# Altium PCB STM32H743I-EVAL2PCBDESIGN.PcbDoc (part 5 of 23)
Units mil, origin at the board's own origin, x right, y up, seen from the top; angles counter-clockwise.
Board outline 6558 x 5417 mil, 8 copper layers (L1_TOP, L2_GND, L3_HS1, L4_POWER, L5_SIG, L6_HS2, L7_GND, L8_BOTTOM), stack 61.368 mil thick; 620 components, 588 nets, 2945 pads, 1724 vias.
Unrouted connection lines stored in the file: 1.
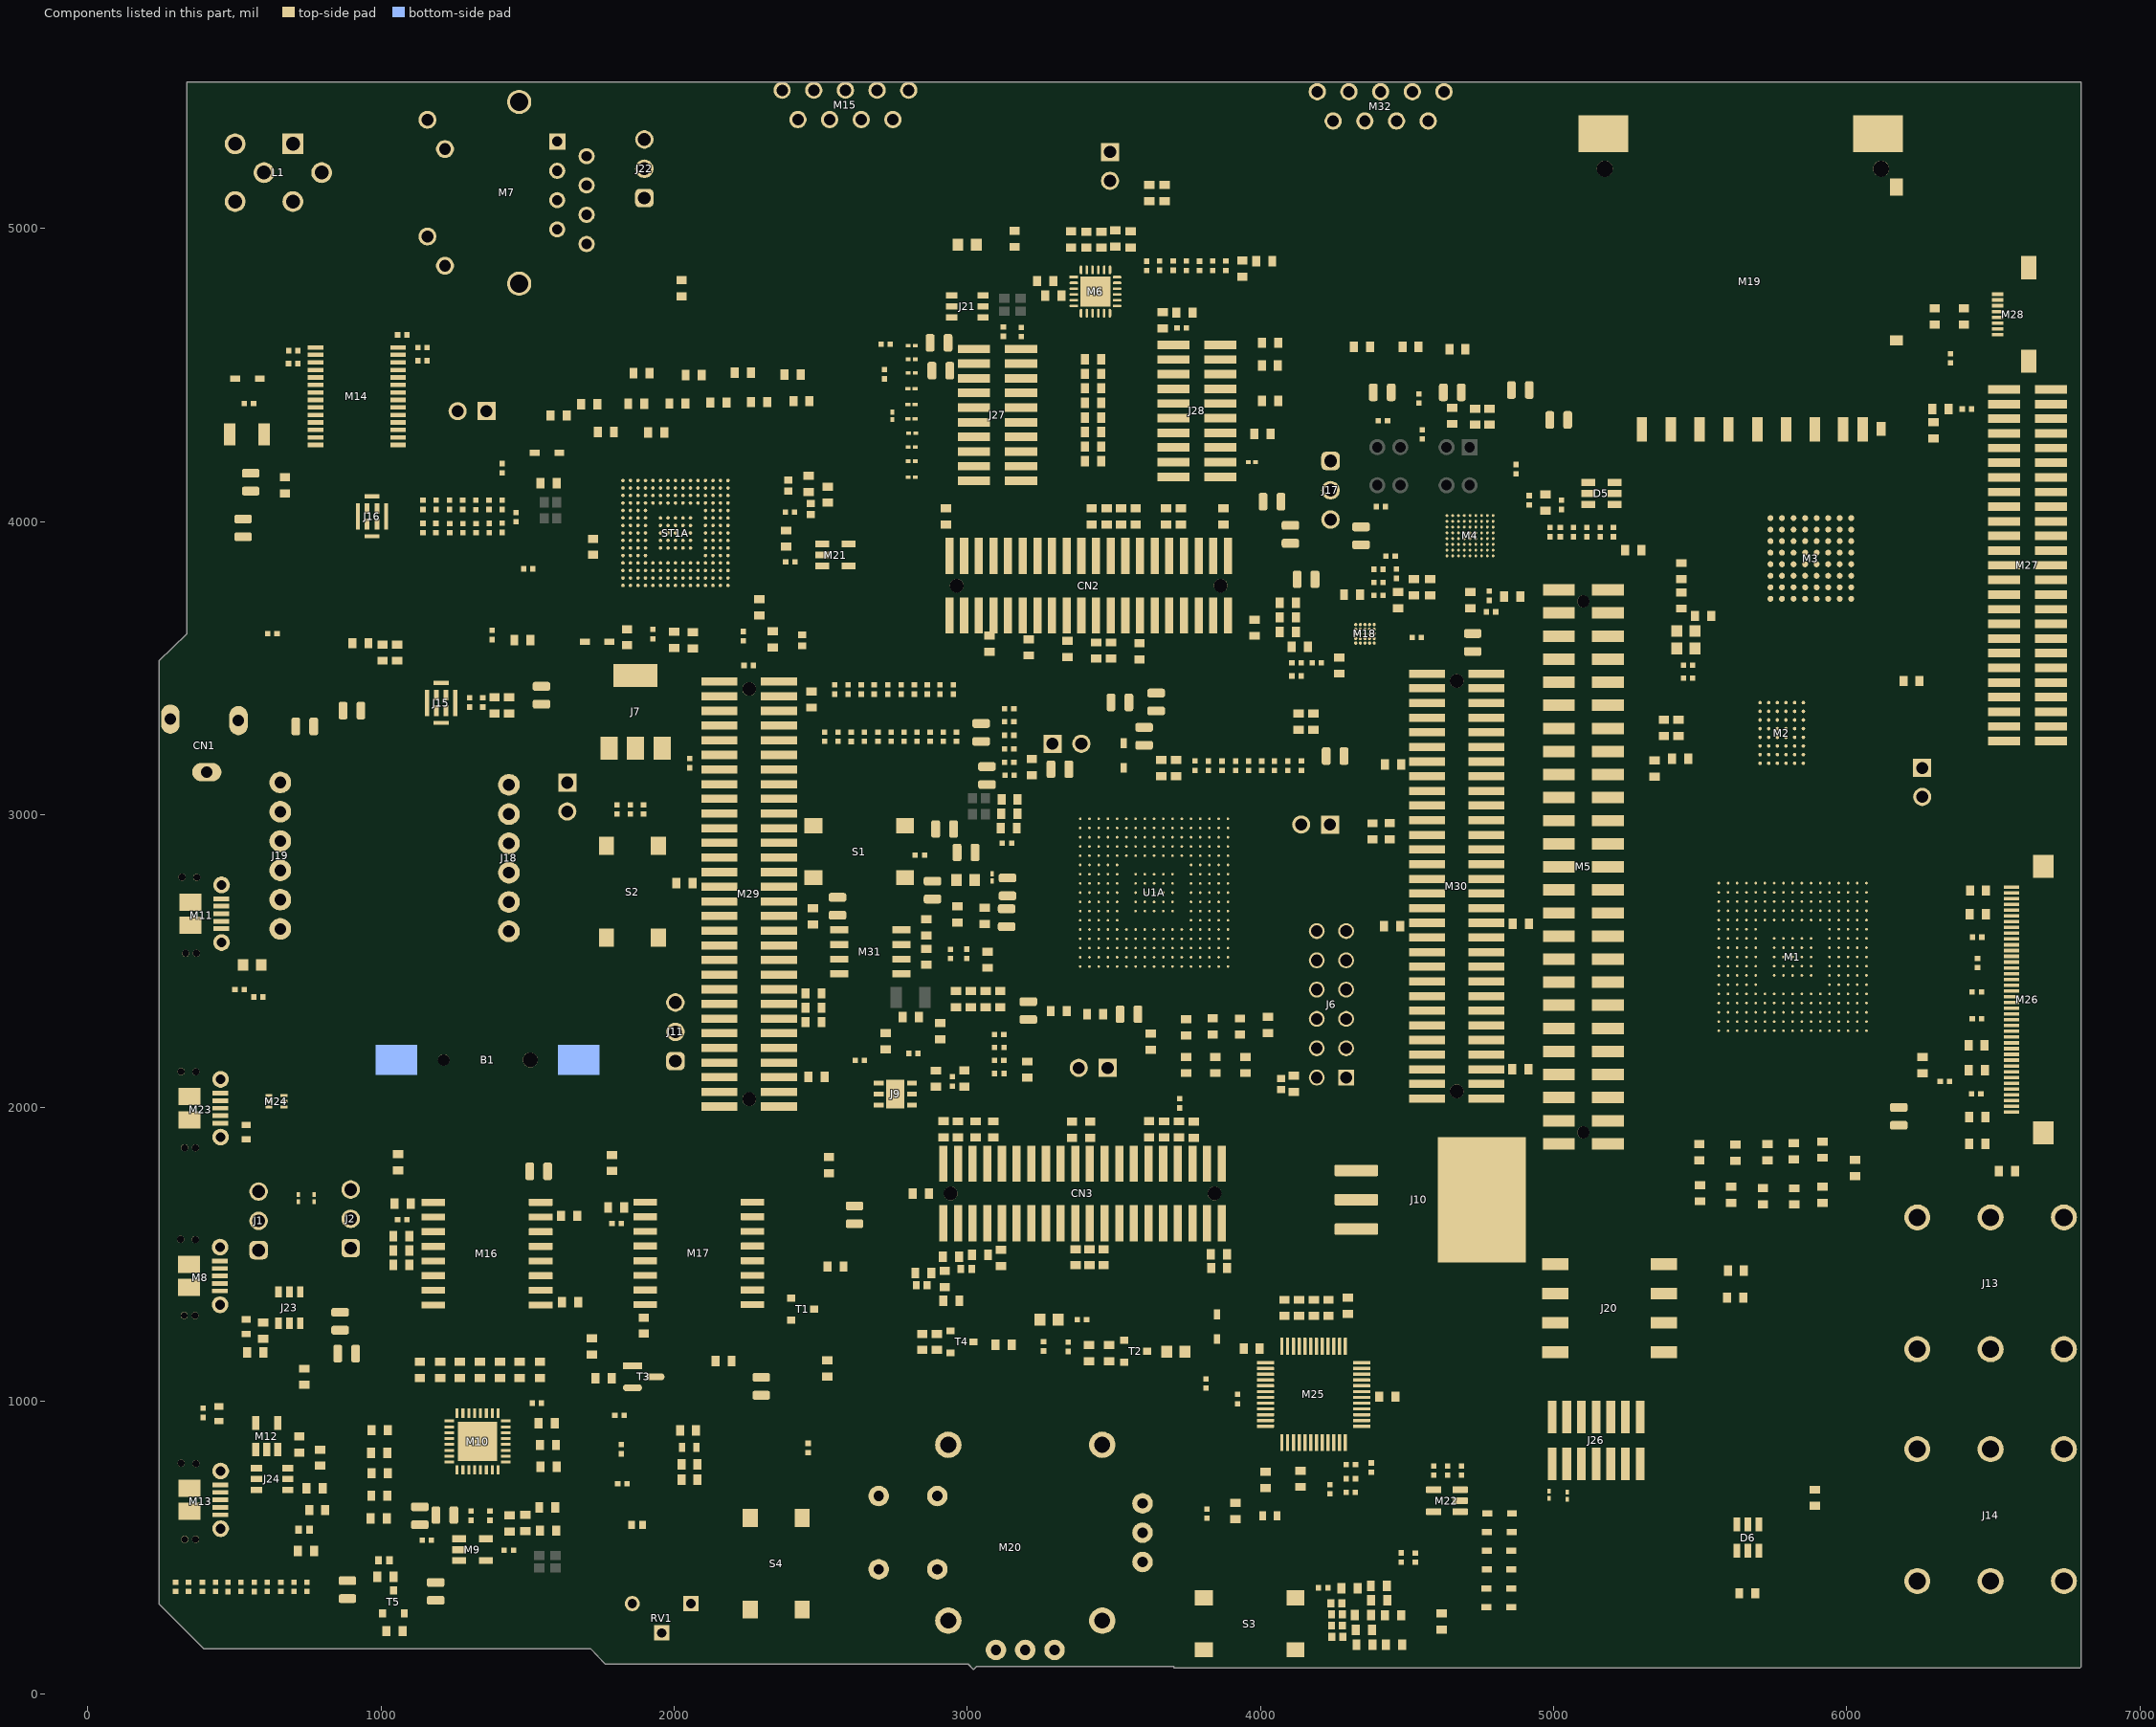
[diagram p8: the components of this part, seen from the top]

## Part data (continued)
J18 J19: "Female, 6C, Rt Angle, .100\"CC; 3.15mm Tail, No Mounting; PBT, Phos. Bronze, 105 C", Color=Black, Current Rating=3A, Dielectric Material=Polyester, Manufacturer=Sullins, Supplier Part Number=S5481-ND, Category="Card Edge Connectors", ComponentLink1Description=https://datasheet.octopart.com:443/PPPC061LGBN-RC-Sullins-datasheet-138810743.pdf?src-supplier=IHS, ComponentLink1URL=https://datasheet.octopart.com:443/PPPC061LGBN-RC-Sullins-datasheet-138810743.pdf?src-supplier=IHS, ComponentLink2Description=https://datasheet.octopart.com:443/PPPC061LGBN-RC-Sullins-datasheet-41308905.pdf?src-supplier=Future+Electronics, ComponentLink2URL=https://datasheet.octopart.com:443/PPPC061LGBN-RC-Sullins-datasheet-41308905.pdf?src-supplier=Future+Electronics, ComponentLink3Description=https://datasheet.octopart.com:443/PPPC061LGBN-RC-Sullins-datasheet-12511165.pdf?src-supplier=Future+Electronics, ComponentLink3URL=https://datasheet.octopart.com:443/PPPC061LGBN-RC-Sullins-datasheet-12511165.pdf?src-supplier=Future+Electronics, ComponentLink4Description=https://datasheet.octopart.com:443/PPPC061LGBN-RC-Sullins-datasheet-11567.pdf?src-supplier=DigiKey, ComponentLink4URL=https://datasheet.octopart.com:443/PPPC061LGBN-RC-Sullins-datasheet-11567.pdf?src-supplier=DigiKey, Connector Type="Header, Socket", Contact Material=Bronze, Contact Plating=Gold, Gender=Female, Height=2.4mm, Housing Color=Black, Housing Material=Plastic, Lead Free="Lead Free", Length=15.7mm, Lifecycle Status=Production, Manufacturer Part Number=PPPC061LGBN-RC, Mounting Technology="Through Hole", Number of Positions=6, Number of Rows=1, Orientation="Right Angle", Packaging=Bulk, Pitch=2.54mm, Pricing="1=0.64, 10=0.54, 100=0.4586, 500=0.40928, 1000=0.38974, 5000=0.3479, 10000=0.3335 (USD)", REACH SVHC=Yes, RoHS=Compliant, Stock=11545, Supplier=DigiKey, Terminal Pitch=2.54mm, Termination=Solder, Width=8.5mm
J20: "PCB Receptacle, Board-to-Board, 2.54 mm, 2 Rows, 8 Contacts, Surface Mount Right Angle", Color=Black, Contact Resistance=10mΩ, Current Rating=4A, Manufacturer=Samtec, Manufacturer Lifecycle Status=PRODUCTION, Max Current Rating=6.9A, Max Operating Temperature=125°C, Max Voltage Rating (AC)=450V, Min Operating Temperature=-55°C, Supplier Part Number=612-SSM-104-L-DH-ND, Category="Board to Board Connectors", ComponentLink1Description=https://datasheet.octopart.com:443/SSM-104-L-DH-Samtec-datasheet-97289092.pdf?src-supplier=Samtec, ComponentLink1URL=https://datasheet.octopart.com:443/SSM-104-L-DH-Samtec-datasheet-97289092.pdf?src-supplier=Samtec, ComponentLink2Description=https://sigma.octopart.com:443/97289093/technical_drawing/Samtec-SSM-104-L-DH.pdf?src-supplier=Samtec, ComponentLink2URL=https://sigma.octopart.com:443/97289093/technical_drawing/Samtec-SSM-104-L-DH.pdf?src-supplier=Samtec, ComponentLink3Description=https://datasheet.octopart.com:443/SSM-104-L-DH-Samtec-datasheet-59161179.pdf?src-supplier=Farnell, ComponentLink3URL=https://datasheet.octopart.com:443/SSM-104-L-DH-Samtec-datasheet-59161179.pdf?src-supplier=Farnell, ComponentLink4Description=https://datasheet.octopart.com:443/SSM-104-L-DH-Samtec-datasheet-5313070.pdf?src-supplier=Farnell, ComponentLink4URL=https://datasheet.octopart.com:443/SSM-104-L-DH-Samtec-datasheet-5313070.pdf?src-supplier=Farnell, ComponentLink5Description=https://datasheet.octopart.com:443/SSM-104-L-DH-Samtec-datasheet-5322758.pdf?src-supplier=Farnell, ComponentLink5URL=https://datasheet.octopart.com:443/SSM-104-L-DH-Samtec-datasheet-5322758.pdf?src-supplier=Farnell, ComponentLink6Description=https://datasheet.octopart.com:443/SSM-104-L-DH-Samtec-datasheet-8448695.pdf?src-supplier=Newark, ComponentLink6URL=https://datasheet.octopart.com:443/SSM-104-L-DH-Samtec-datasheet-8448695.pdf?src-supplier=Newark, ComponentLink7Description=https://datasheet.octopart.com:443/SSM-104-L-DH-Samtec-datasheet-5318838.pdf?src-supplier=Newark, ComponentLink7URL=https://datasheet.octopart.com:443/SSM-104-L-DH-Samtec-datasheet-5318838.pdf?src-supplier=Newark, ComponentLink8Description=https://datasheet.octopart.com:443/SSM-104-L-DH-Samtec-datasheet-24969253.pdf?src-supplier=Newark, ComponentLink8URL=https://datasheet.octopart.com:443/SSM-104-L-DH-Samtec-datasheet-24969253.pdf?src-supplier=Newark, ComponentLink9Description=https://datasheet.octopart.com:443/SSM-104-L-DH-Samtec-datasheet-140825051.pdf?src-supplier=Master+Electronics, ComponentLink9URL=https://datasheet.octopart.com:443/SSM-104-L-DH-Samtec-datasheet-140825051.pdf?src-supplier=Master+Electronics, ComponentLink10Description=https://datasheet.octopart.com:443/SSM-104-L-DH-Samtec-datasheet-118235308.pdf?src-supplier=Master+Electronics, ComponentLink10URL=https://datasheet.octopart.com:443/SSM-104-L-DH-Samtec-datasheet-118235308.pdf?src-supplier=Master+Electronics, ComponentLink11Description=https://datasheet.octopart.com:443/SSM-104-L-DH-Samtec-datasheet-86818376.pdf?src-supplier=Sager+Electronics, ComponentLink11URL=https://datasheet.octopart.com:443/SSM-104-L-DH-Samtec-datasheet-86818376.pdf?src-supplier=Sager+Electronics, ComponentLink12Description=https://datasheet.octopart.com:443/SSM-104-L-DH-Samtec-datasheet-151470497.pdf?src-supplier=Sager+Electronics, ComponentLink12URL=https://datasheet.octopart.com:443/SSM-104-L-DH-Samtec-datasheet-151470497.pdf?src-supplier=Sager+Electronics, ComponentLink13Description=https://datasheet.octopart.com:443/SSM-104-L-DH-Samtec-datasheet-184352574.pdf?src-supplier=JRH+Electronics, ComponentLink13URL=https://datasheet.octopart.com:443/SSM-104-L-DH-Samtec-datasheet-184352574.pdf?src-supplier=JRH+Electronics, ComponentLink14Description=https://datasheet.octopart.com:443/SSM-104-L-DH-Samtec-datasheet-136395483.pdf?src-supplier=Toby+Electronics, ComponentLink14URL=https://datasheet.octopart.com:443/SSM-104-L-DH-Samtec-datasheet-136395483.pdf?src-supplier=Toby+Electronics, Connector Type="Receptacle, Socket", Contact Material=Bronze, Contact Plating=Gold, Depth=11.18mm, Gender=Receptacle, Housing Color=Black, Lead Free="Lead Free", Lead Pitch=2.54mm, Length=10.16mm, Lifecycle Status=Production, Manufacturer Part Number=SSM-104-L-DH, Mounting Technology="Surface Mount", Number of Contacts=8, Number of Positions=8, Number of Rows=2, Orientation="Right Angle", Pitch=2.54mm, Pricing="1=2.91, 50=2.403, 100=1.995, 500=1.694, 1000=1.59375 (USD)", Radiation Hardening=No, REACH SVHC=No, RoHS=Compliant, Row Spacing=2.54mm, Stock=1, Supplier=DigiKey, Termination=Solder, Voltage Rating=450V, Voltage Rating (AC)=450V, Width=8.13mm
J21 J23 J24: "STMicroelectronics USBLC6-4SC6 Diode TVS USBLC6-4SC6 Tape Reel Surge Protection", Breakdown Voltage=8V, Case/Package=SOT-23, Clamping Voltage=17V, Forward Voltage=860mV, Leakage Current=150nA, Manufacturer=STMicroelectronics, Max Breakdown Voltage=10V, Max Junction Temperature (Tj)=125°C, Max Reverse Leakage Current=2µA, Min Breakdown Voltage=6V, Min Operating Temperature=-40°C, Peak Pulse Current=5A, Peak Pulse Power=130W, Power Line Protection=Yes, Reverse Standoff Voltage=5V, Supplier Part Number=497-4492-2-ND, Test Current=1mA, Category="TVS Diodes", China RoHS=Compliant, ComponentLink1Description=https://datasheet.octopart.com:443/USBLC6-4SC6-STMicroelectronics-datasheet-10411966.pdf?src-supplier=Upverter, ComponentLink1URL=https://datasheet.octopart.com:443/USBLC6-4SC6-STMicroelectronics-datasheet-10411966.pdf?src-supplier=Upverter, ComponentLink2Description=https://datasheet.octopart.com:443/USBLC6-4SC6-STMicroelectronics-datasheet-58295097.pdf?src-supplier=Future+Electronics, ComponentLink2URL=https://datasheet.octopart.com:443/USBLC6-4SC6-STMicroelectronics-datasheet-58295097.pdf?src-supplier=Future+Electronics, ComponentLink3Description=https://datasheet.octopart.com:443/USBLC6-4SC6-STMicroelectronics-datasheet-5415472.pdf?src-supplier=Factory+Futures, ComponentLink3URL=https://datasheet.octopart.com:443/USBLC6-4SC6-STMicroelectronics-datasheet-5415472.pdf?src-supplier=Factory+Futures, ComponentLink4Description=https://datasheet.octopart.com:443/USBLC6-4SC6-STMicroelectronics-datasheet-93958.pdf?src-supplier=Nu+Horizons, ComponentLink4URL=https://datasheet.octopart.com:443/USBLC6-4SC6-STMicroelectronics-datasheet-93958.pdf?src-supplier=Nu+Horizons, ComponentLink5Description=https://datasheet.octopart.com:443/USBLC6-4SC6-STMicroelectronics-datasheet-14050649.pdf?src-supplier=iiiC, ComponentLink5URL=https://datasheet.octopart.com:443/USBLC6-4SC6-STMicroelectronics-datasheet-14050649.pdf?src-supplier=iiiC, ComponentLink6Description=https://datasheet.octopart.com:443/USBLC6-4SC6-STMicroelectronics-datasheet-8428582.pdf?src-supplier=Jameco+(USA), ComponentLink6URL=https://datasheet.octopart.com:443/USBLC6-4SC6-STMicroelectronics-datasheet-8428582.pdf?src-supplier=Jameco+(USA), ComponentLink7Description=https://datasheet.octopart.com:443/USBLC6-4SC6-STMicroelectronics-datasheet-46285.pdf?src-supplier=Farnell, ComponentLink7URL=https://datasheet.octopart.com:443/USBLC6-4SC6-STMicroelectronics-datasheet-46285.pdf?src-supplier=Farnell, Contact Plating=Tin, Depth=1.75mm, Direction=Unidirectional, ESD Protection=Yes, Height=1.45mm, Interface="Ethernet, USB", Lead Free="Lead Free", Length=3mm, Lifecycle Status=Production, Manufacturer Part Number=USBLC6-4SC6, Max Operating Temperature=125°C, Mounting Technology="Surface Mount", Number of Bidirectional Channels=4, Number of Channels=4, Number of Elements=1, Number of Terminals=6, Operating Supply Voltage=860mV, Packaging="Cut Tape", Peak Reverse Current=150nA, Pins=6, Polarity=Unidirectional, Pricing="3000=0.13528, 9000=0.11686 (USD)", Radiation Hardening=No, REACH SVHC=Yes, Reverse Breakdown Voltage=6V, RoHS=Compliant, Schedule B="8536300000, 8536300000|8536300000|8536300000|8536300000|8536300000", Stock=34382, Supplier=DigiKey, Termination=SMD/SMT, Voltage Rating (DC)=5V, Weight=4.535924g, Width=1.75mm, Working Voltage=5V
J26: library part FTSH-107-01-L-DV, "Pin Header, Wire-to-Board, 1.27 mm, 2 Rows, 14 Contacts, Surface Mount, FTSH Series", Color=Black, Manufacturer=Samtec, Manufacturer Lifecycle Status=PRODUCTION, Max Operating Temperature=125°C, Min Operating Temperature=-55°C, Supplier Part Number=612-FTSH-107-01-L-DV-ND, Category="Headers and Wire Housings", ComponentLink1Description=https://datasheet.octopart.com:443/FTSH-107-01-L-DV-Samtec-datasheet-140825048.pdf?src-supplier=Master+Electronics, ComponentLink1URL=https://datasheet.octopart.com:443/FTSH-107-01-L-DV-Samtec-datasheet-140825048.pdf?src-supplier=Master+Electronics, ComponentLink2Description=https://sigma.octopart.com:443/140871554/technical_drawing/Samtec-FTSH-107-01-L-DV.pdf?src-supplier=Samtec, ComponentLink2URL=https://sigma.octopart.com:443/140871554/technical_drawing/Samtec-FTSH-107-01-L-DV.pdf?src-supplier=Samtec, ComponentLink3Description=https://sigma.octopart.com:443/97029548/technical_drawing/Samtec-FTSH-107-01-L-DV.pdf?src-supplier=Samtec, ComponentLink3URL=https://sigma.octopart.com:443/97029548/technical_drawing/Samtec-FTSH-107-01-L-DV.pdf?src-supplier=Samtec, ComponentLink4Description=https://datasheet.octopart.com:443/FTSH-107-01-L-DV-Samtec-datasheet-97029545.pdf?src-supplier=Samtec, ComponentLink4URL=https://datasheet.octopart.com:443/FTSH-107-01-L-DV-Samtec-datasheet-97029545.pdf?src-supplier=Samtec, ComponentLink5Description=https://datasheet.octopart.com:443/FTSH-107-01-L-DV-Samtec-datasheet-62087996.pdf?src-supplier=Farnell, ComponentLink5URL=https://datasheet.octopart.com:443/FTSH-107-01-L-DV-Samtec-datasheet-62087996.pdf?src-supplier=Farnell, ComponentLink6Description=https://datasheet.octopart.com:443/FTSH-107-01-L-DV-Samtec-datasheet-8388575.pdf?src-supplier=Farnell, ComponentLink6URL=https://datasheet.octopart.com:443/FTSH-107-01-L-DV-Samtec-datasheet-8388575.pdf?src-supplier=Farnell, ComponentLink7Description=https://datasheet.octopart.com:443/FTSH-107-01-L-DV-Samtec-datasheet-118235238.pdf?src-supplier=Electro+Sonic, ComponentLink7URL=https://datasheet.octopart.com:443/FTSH-107-01-L-DV-Samtec-datasheet-118235238.pdf?src-supplier=Electro+Sonic, ComponentLink8Description=https://datasheet.octopart.com:443/FTSH-107-01-L-DV-Samtec-datasheet-86818370.pdf?src-supplier=Sager+Electronics, ComponentLink8URL=https://datasheet.octopart.com:443/FTSH-107-01-L-DV-Samtec-datasheet-86818370.pdf?src-supplier=Sager+Electronics, ComponentLink9Description=https://datasheet.octopart.com:443/FTSH-107-01-L-DV-Samtec-datasheet-151470459.pdf?src-supplier=Sager+Electronics, ComponentLink9URL=https://datasheet.octopart.com:443/FTSH-107-01-L-DV-Samtec-datasheet-151470459.pdf?src-supplier=Sager+Electronics, ComponentLink10Description=https://datasheet.octopart.com:443/FTSH-107-01-L-DV-Samtec-datasheet-151470458.pdf?src-supplier=Sager+Electronics, ComponentLink10URL=https://datasheet.octopart.com:443/FTSH-107-01-L-DV-Samtec-datasheet-151470458.pdf?src-supplier=Sager+Electronics, ComponentLink11Description=https://datasheet.octopart.com:443/FTSH-107-01-L-DV-Samtec-datasheet-8459893.pdf?src-supplier=Newark, ComponentLink11URL=https://datasheet.octopart.com:443/FTSH-107-01-L-DV-Samtec-datasheet-8459893.pdf?src-supplier=Newark, ComponentLink12Description=https://datasheet.octopart.com:443/FTSH-107-01-L-DV-Samtec-datasheet-5313432.pdf?src-supplier=Newark, ComponentLink12URL=https://datasheet.octopart.com:443/FTSH-107-01-L-DV-Samtec-datasheet-5313432.pdf?src-supplier=Newark, ComponentLink13Description=https://datasheet.octopart.com:443/FTSH-107-01-L-DV-Samtec-datasheet-138830557.pdf?src-supplier=Newark, ComponentLink13URL=https://datasheet.octopart.com:443/FTSH-107-01-L-DV-Samtec-datasheet-138830557.pdf?src-supplier=Newark, ComponentLink14Description=https://datasheet.octopart.com:443/FTSH-107-01-L-DV-Samtec-datasheet-21214417.pdf?src-supplier=Newark, ComponentLink14URL=https://datasheet.octopart.com:443/FTSH-107-01-L-DV-Samtec-datasheet-21214417.pdf?src-supplier=Newark, ComponentLink15Description=https://datasheet.octopart.com:443/FTSH-107-01-L-DV-Samtec-datasheet-180249087.pdf?src-supplier=JRH+Electronics, ComponentLink15URL=https://datasheet.octopart.com:443/FTSH-107-01-L-DV-Samtec-datasheet-180249087.pdf?src-supplier=JRH+Electronics, ComponentLink16Description=https://datasheet.octopart.com:443/FTSH-107-01-L-DV-Samtec-datasheet-176663386.pdf?src-supplier=Toby+Electronics, ComponentLink16URL=https://datasheet.octopart.com:443/FTSH-107-01-L-DV-Samtec-datasheet-176663386.pdf?src-supplier=Toby+Electronics, ComponentLink17Description=https://datasheet.octopart.com:443/FTSH-107-01-L-DV-Samtec-datasheet-133497664.pdf?src-supplier=Toby+Electronics, ComponentLink17URL=https://datasheet.octopart.com:443/FTSH-107-01-L-DV-Samtec-datasheet-133497664.pdf?src-supplier=Toby+Electronics, ComponentLink18Description=https://datasheet.octopart.com:443/FTSH-107-01-L-DV-Samtec-datasheet-116535196.pdf?src-supplier=Toby+Electronics, ComponentLink18URL=https://datasheet.octopart.com:443/FTSH-107-01-L-DV-Samtec-datasheet-116535196.pdf?src-supplier=Toby+Electronics, Connector Type="Male Pin", Contact Material=Bronze, Contact Mating Length=3.048mm, Contact Plating=Gold, Depth=5.84mm, Gender=Male, Housing Color=Black, Lead Free="Lead Free", Lead Pitch=1.27mm, Length=8.89mm, Lifecycle Status=Production, Manufacturer Part Number=FTSH-107-01-L-DV, Mounting Technology="Surface Mount", Number of Contacts=14, Number of Positions=14, Number of Rows=2, Orientation=Straight, Packaging=Bulk, Pitch=1.27mm, Pricing="1=2.6, 10=2.206, 100=1.8745, 500=1.67322, 1000=1.59339, 5000=1.505 (USD)", Radiation Hardening=No, REACH SVHC=No, RoHS=Compliant, Row Spacing=1.27mm, Stock=385, Supplier=DigiKey, Termination=Solder
J27 J28: "CONN HEADER SMD 20POS 1.27MM / Connector Header Surface Mount 20 position 0.050\" (1.27mm)", Color=Black, Current Rating=3.4A, Manufacturer=Samtec, Manufacturer Lifecycle Status=PRODUCTION, Max Current Rating=1.75A, Max Operating Temperature=125°C, Min Operating Temperature=-55°C, Supplier Part Number=612-FTSH-110-01-L-DV-ND, Category="Headers and Wire Housings", ComponentLink1Description=https://datasheet.octopart.com:443/FTSH-110-01-L-DV-Samtec-datasheet-140825048.pdf?src-supplier=Electro+Sonic, ComponentLink1URL=https://datasheet.octopart.com:443/FTSH-110-01-L-DV-Samtec-datasheet-140825048.pdf?src-supplier=Electro+Sonic, ComponentLink2Description=https://datasheet.octopart.com:443/FTSH-110-01-L-DV-Samtec-datasheet-33007714.pdf?src-supplier=Electro+Sonic, ComponentLink2URL=https://datasheet.octopart.com:443/FTSH-110-01-L-DV-Samtec-datasheet-33007714.pdf?src-supplier=Electro+Sonic, ComponentLink3Description=https://datasheet.octopart.com:443/FTSH-110-01-L-DV-Samtec-datasheet-37173854.pdf?src-supplier=Electro+Sonic, ComponentLink3URL=https://datasheet.octopart.com:443/FTSH-110-01-L-DV-Samtec-datasheet-37173854.pdf?src-supplier=Electro+Sonic, ComponentLink4Description=https://datasheet.octopart.com:443/FTSH-110-01-L-DV-Samtec-datasheet-86818370.pdf?src-supplier=Upverter, ComponentLink4URL=https://datasheet.octopart.com:443/FTSH-110-01-L-DV-Samtec-datasheet-86818370.pdf?src-supplier=Upverter, ComponentLink5Description=https://sigma.octopart.com:443/138897706/technical_drawing/Samtec-FTSH-110-01-L-DV.pdf?src-supplier=Upverter, ComponentLink5URL=https://sigma.octopart.com:443/138897706/technical_drawing/Samtec-FTSH-110-01-L-DV.pdf?src-supplier=Upverter, ComponentLink6Description=https://sigma.octopart.com:443/140871554/technical_drawing/Samtec-FTSH-110-01-L-DV.pdf?src-supplier=Samtec, ComponentLink6URL=https://sigma.octopart.com:443/140871554/technical_drawing/Samtec-FTSH-110-01-L-DV.pdf?src-supplier=Samtec, ComponentLink7Description=https://sigma.octopart.com:443/97029548/technical_drawing/Samtec-FTSH-110-01-L-DV.pdf?src-supplier=Samtec, ComponentLink7URL=https://sigma.octopart.com:443/97029548/technical_drawing/Samtec-FTSH-110-01-L-DV.pdf?src-supplier=Samtec, ComponentLink8Description=https://datasheet.octopart.com:443/FTSH-110-01-L-DV-Samtec-datasheet-97029545.pdf?src-supplier=Samtec, ComponentLink8URL=https://datasheet.octopart.com:443/FTSH-110-01-L-DV-Samtec-datasheet-97029545.pdf?src-supplier=Samtec, ComponentLink9Description=https://datasheet.octopart.com:443/FTSH-110-01-L-DV-Samtec-datasheet-62087996.pdf?src-supplier=Newark, ComponentLink9URL=https://datasheet.octopart.com:443/FTSH-110-01-L-DV-Samtec-datasheet-62087996.pdf?src-supplier=Newark, ComponentLink10Description=https://datasheet.octopart.com:443/FTSH-110-01-L-DV-Samtec-datasheet-100454331.pdf?src-supplier=Master+Electronics, ComponentLink10URL=https://datasheet.octopart.com:443/FTSH-110-01-L-DV-Samtec-datasheet-100454331.pdf?src-supplier=Master+Electronics, ComponentLink11Description=https://datasheet.octopart.com:443/FTSH-110-01-L-DV-Samtec-datasheet-8459893.pdf?src-supplier=Farnell, ComponentLink11URL=https://datasheet.octopart.com:443/FTSH-110-01-L-DV-Samtec-datasheet-8459893.pdf?src-supplier=Farnell, ComponentLink12Description=https://datasheet.octopart.com:443/FTSH-110-01-L-DV-Samtec-datasheet-5313432.pdf?src-supplier=Farnell, ComponentLink12URL=https://datasheet.octopart.com:443/FTSH-110-01-L-DV-Samtec-datasheet-5313432.pdf?src-supplier=Farnell, ComponentLink13Description=https://datasheet.octopart.com:443/FTSH-110-01-L-DV-Samtec-datasheet-5307899.pdf?src-supplier=Farnell, ComponentLink13URL=https://datasheet.octopart.com:443/FTSH-110-01-L-DV-Samtec-datasheet-5307899.pdf?src-supplier=Farnell, ComponentLink14Description=https://datasheet.octopart.com:443/FTSH-110-01-L-DV-Samtec-datasheet-5314914.pdf?src-supplier=element14+APAC, ComponentLink14URL=https://datasheet.octopart.com:443/FTSH-110-01-L-DV-Samtec-datasheet-5314914.pdf?src-supplier=element14+APAC, ComponentLink15Description=https://datasheet.octopart.com:443/FTSH-110-01-L-DV-Samtec-datasheet-183475175.pdf?src-supplier=JRH+Electronics, ComponentLink15URL=https://datasheet.octopart.com:443/FTSH-110-01-L-DV-Samtec-datasheet-183475175.pdf?src-supplier=JRH+Electronics, ComponentLink16Description=https://datasheet.octopart.com:443/FTSH-110-01-L-DV-Samtec-datasheet-176663386.pdf?src-supplier=Toby+Electronics, ComponentLink16URL=https://datasheet.octopart.com:443/FTSH-110-01-L-DV-Samtec-datasheet-176663386.pdf?src-supplier=Toby+Electronics, ComponentLink17Description=https://datasheet.octopart.com:443/FTSH-110-01-L-DV-Samtec-datasheet-133497664.pdf?src-supplier=Toby+Electronics, ComponentLink17URL=https://datasheet.octopart.com:443/FTSH-110-01-L-DV-Samtec-datasheet-133497664.pdf?src-supplier=Toby+Electronics, ComponentLink18Description=https://datasheet.octopart.com:443/FTSH-110-01-L-DV-Samtec-datasheet-116535196.pdf?src-supplier=Toby+Electronics, ComponentLink18URL=https://datasheet.octopart.com:443/FTSH-110-01-L-DV-Samtec-datasheet-116535196.pdf?src-supplier=Toby+Electronics, ComponentLink19Description=https://datasheet.octopart.com:443/FTSH-110-01-L-DV-Samtec-datasheet-151470459.pdf?src-supplier=Sager+Electronics, ComponentLink19URL=https://datasheet.octopart.com:443/FTSH-110-01-L-DV-Samtec-datasheet-151470459.pdf?src-supplier=Sager+Electronics, ComponentLink20Description=https://datasheet.octopart.com:443/FTSH-110-01-L-DV-Samtec-datasheet-151470458.pdf?src-supplier=Sager+Electronics, ComponentLink20URL=https://datasheet.octopart.com:443/FTSH-110-01-L-DV-Samtec-datasheet-151470458.pdf?src-supplier=Sager+Electronics, ComponentLink21Description=https://datasheet.octopart.com:443/FTSH-110-01-L-DV-Samtec-datasheet-150877546.pdf?src-supplier=Sager+Electronics, ComponentLink21URL=https://datasheet.octopart.com:443/FTSH-110-01-L-DV-Samtec-datasheet-150877546.pdf?src-supplier=Sager+Electronics, ComponentLink22Description=https://datasheet.octopart.com:443/FTSH-110-01-L-DV-Samtec-datasheet-138897704.pdf?src-supplier=HQonline, ComponentLink22URL=https://datasheet.octopart.com:443/FTSH-110-01-L-DV-Samtec-datasheet-138897704.pdf?src-supplier=HQonline, Connector Type="Male Pin", Contact Material=Gold, Contact Mating Length=3.048mm, Contact Plating=Gold, Depth=3.43mm, Gender=Male, Height=5.97mm, Housing Color=Black, Lead Free="Lead Free", Length=12.7mm, Lifecycle Status=Production, Manufacturer Package Identifier=FTSH-110-01-L-DV, Manufacturer Part Number=FTSH-110-01-L-DV, Mounting Technology="Surface Mount", Number of Contacts=20, Number of Positions=20, Number of Rows=2, Packaging=Bulk, Pins=20, Pitch=1.27mm, Pricing="1=2.25, 10=1.912, 100=1.6252, 500=1.45068, 1000=1.38145, 5000=1.2875 (USD)", Radiation Hardening=No, REACH SVHC=No, RoHS=Compliant, Row Spacing=1.27mm, Stock=4283, Supplier=DigiKey, Termination=Solder
L1: "Power Line Filter, Emi, 10A, 50V, Th;", Current Rating=10A, Frequency=500.5MHz, Insulation Resistance=100MΩ, Manufacturer=Murata, Max Operating Temperature=85°C, Min Operating Temperature=-40°C, Supplier Part Number=490-18606-ND, Voltage Rating=50V, Category="EMI / RFI Filters", ComponentLink1Description=https://datasheet.octopart.com:443/BNX002-11-Murata-datasheet-180807249.pdf?src-supplier=IHS, ComponentLink1URL=https://datasheet.octopart.com:443/BNX002-11-Murata-datasheet-180807249.pdf?src-supplier=IHS, ComponentLink2Description=https://datasheet.octopart.com:443/BNX002-11-Murata-datasheet-138707586.pdf?src-supplier=ODG+(Origin+Data+Global), ComponentLink2URL=https://datasheet.octopart.com:443/BNX002-11-Murata-datasheet-138707586.pdf?src-supplier=ODG+(Origin+Data+Global), ComponentLink3Description=https://datasheet.octopart.com:443/BNX002-11-Murata-datasheet-140880448.pdf?src-supplier=TME, ComponentLink3URL=https://datasheet.octopart.com:443/BNX002-11-Murata-datasheet-140880448.pdf?src-supplier=TME, ComponentLink4Description=https://datasheet.octopart.com:443/BNX002-11-Murata-datasheet-166534775.pdf?src-supplier=Arrow.cn, ComponentLink4URL=https://datasheet.octopart.com:443/BNX002-11-Murata-datasheet-166534775.pdf?src-supplier=Arrow.cn, ComponentLink5Description=https://datasheet.octopart.com:443/BNX002-11-Murata-datasheet-151955978.pdf?src-supplier=SOS+electronic, ComponentLink5URL=https://datasheet.octopart.com:443/BNX002-11-Murata-datasheet-151955978.pdf?src-supplier=SOS+electronic, ComponentLink6Description=https://datasheet.octopart.com/BNX002-11-Murata-datasheet-129162059.pdf, ComponentLink6URL=https://datasheet.octopart.com/BNX002-11-Murata-datasheet-129162059.pdf, ComponentLink7Description=http://sigma.octopart.com:80/reach_statement/Murata-company-16.pdf?src-supplier=Compliance+Statements, ComponentLink7URL=http://sigma.octopart.com:80/reach_statement/Murata-company-16.pdf?src-supplier=Compliance+Statements, Export Control Classification Number (ECCN) Code=EAR99, Harmonized Tariff Schedule (HTS) Code=8504.50.80.00, Height=12.5mm, Impedance=50Ω, Introduction Date=2019-01-02, Length=12mm, Lifecycle Status=Production, Manufacturer Part Number=BNX002-11, Number of Circuits=1, Packaging=Box, Pricing="1=7.96, 10=6.49, 25=5.9856, 50=5.6306, 100=5.2966, 300=4.80703, 500=4.59488, 1000=4.32164 (USD)", REACH SVHC=Yes, RoHS=Compliant, Stock=13871, Supplier=DigiKey, Voltage Rating (DC)=50V, Width=11mm
L2 L3 L4 L5 L6 L7 L8: "Ferrite Beads Power Chip 18Ohm 30% 100MHz 7.5A 0.004Ohm DCR 0603 Automotive T/R", Case Code (Imperial)=0603, Case Code (Metric)=1608, Clock Frequency=100MHz, Current Rating=7.5A, DC Resistance (DCR)=4mΩ, Manufacturer="TAIYO YUDEN", Max Operating Temperature=125°C, Min Operating Temperature=-40°C, Supplier Part Number=587-3251-6-ND, Tolerance=30%, Case/Package=0603, Category="Ferrite Beads and Chips", ComponentLink1Description=https://datasheet.octopart.com:443/FBMJ1608HM180NTR-Taiyo-Yuden-datasheet-151884371.pdf?src-supplier=IHS, ComponentLink1URL=https://datasheet.octopart.com:443/FBMJ1608HM180NTR-Taiyo-Yuden-datasheet-151884371.pdf?src-supplier=IHS, ComponentLink2Description=https://datasheet.octopart.com:443/FBMJ1608HM180NTR-Taiyo-Yuden-datasheet-154808389.pdf?src-supplier=Master+Electronics, ComponentLink2URL=https://datasheet.octopart.com:443/FBMJ1608HM180NTR-Taiyo-Yuden-datasheet-154808389.pdf?src-supplier=Master+Electronics, ComponentLink3Description=https://datasheet.octopart.com:443/FBMJ1608HM180NTR-Taiyo-Yuden-datasheet-112254974.pdf?src-supplier=Newark, ComponentLink3URL=https://datasheet.octopart.com:443/FBMJ1608HM180NTR-Taiyo-Yuden-datasheet-112254974.pdf?src-supplier=Newark, ComponentLink4Description=https://datasheet.octopart.com:443/FBMJ1608HM180NTR-Taiyo-Yuden-datasheet-99833420.pdf?src-supplier=Future+Electronics, ComponentLink4URL=https://datasheet.octopart.com:443/FBMJ1608HM180NTR-Taiyo-Yuden-datasheet-99833420.pdf?src-supplier=Future+Electronics, ComponentLink5Description=https://datasheet.octopart.com/FBMJ1608HM180NTR-Taiyo-Yuden-datasheet-17272611.pdf, ComponentLink5URL=https://datasheet.octopart.com/FBMJ1608HM180NTR-Taiyo-Yuden-datasheet-17272611.pdf, Halogen Free="Halogen Free", Height=800µm, Impedance=18Ω, Length=1.6mm, Lifecycle Status=Production, Manufacturer Part Number=FBMJ1608HM180NTR, Max Current Rating=7.5A, Max DC Current=7.5A, Max Length=1.8mm, Max Thickness=1mm, Max Width=1mm, Min Length=1.4mm, Min Thickness=600µm, Min Width=600µm, Mounting Technology="Surface Mount", Number of Circuits=1, Number of Lines=1, Number of Terminals=2, Packaging="Cut Tape (CT)", Pricing="1=0.12, 10=0.085, 25=0.0744, 50=0.0666, 100=0.0596, 250=0.05132, 500=0.04556, 1000=0.04024 (USD)", REACH SVHC=Yes, RoHS=Compliant, Stock=36635, Supplier=DigiKey, Termination=SMD/SMT, Test Frequency=100MHz, Weight=2.012816mg, Width=800µm
LD1 LD2 LD3 LD4 LD5 LD6 LD7 LD8 LD9: library part led_green, "LED"
M1: "IC DRAM 256MBIT PAR 90TFBGA"
M2: "16Mb （1M x 16） 1 M x 16 2.4V 95mA 3.6V Parallel 16bit BGA-48 SMD mount 11mm*9mm*1.2mm", Case/Package=TFBGA, Manufacturer=ISSI, Max Operating Temperature=85°C, Max Supply Current=95mA, Max Supply Voltage=3.6V, Min Operating Temperature=-40°C, Min Supply Voltage=2.4V, Nominal Supply Voltage (DC)=3V, Operating Supply Voltage=3.3V, Supplier Part Number=706-1054-ND, Temperature Grade=Industrial, Access Time=10ns, Address Bus Width=20b, Category=RAM, China RoHS=Compliant, ComponentLink1Description=https://datasheet.octopart.com:443/IS61WV102416BLL-10MLI-ISSI-datasheet-134530440.pdf?src-supplier=IHS, ComponentLink1URL=https://datasheet.octopart.com:443/IS61WV102416BLL-10MLI-ISSI-datasheet-134530440.pdf?src-supplier=IHS, ComponentLink2Description=https://datasheet.octopart.com:443/IS61WV102416BLL-10MLI-ISSI-datasheet-11874037.pdf?src-supplier=element14+APAC, ComponentLink2URL=https://datasheet.octopart.com:443/IS61WV102416BLL-10MLI-ISSI-datasheet-11874037.pdf?src-supplier=element14+APAC, ComponentLink3Description=https://datasheet.octopart.com:443/IS61WV102416BLL-10MLI-ISSI-datasheet-140480371.pdf?src-supplier=Augswan, ComponentLink3URL=https://datasheet.octopart.com:443/IS61WV102416BLL-10MLI-ISSI-datasheet-140480371.pdf?src-supplier=Augswan, ComponentLink4Description=https://datasheet.octopart.com:443/IS61WV102416BLL-10MLI-ISSI-datasheet-14189571.pdf?src-supplier=iiiC, ComponentLink4URL=https://datasheet.octopart.com:443/IS61WV102416BLL-10MLI-ISSI-datasheet-14189571.pdf?src-supplier=iiiC, ComponentLink5Description=https://datasheet.octopart.com:443/IS61WV102416BLL-10MLI-ISSI-datasheet-26506.pdf?src-supplier=Mouser, ComponentLink5URL=https://datasheet.octopart.com:443/IS61WV102416BLL-10MLI-ISSI-datasheet-26506.pdf?src-supplier=Mouser, Country of Origin="Mainland China, Taiwan", Density=16Mb, Export Control Classification Number (ECCN) Code=3A991.b.2.a, Harmonized Tariff Schedule (HTS) Code=8542.32.00.41, Height - Seated (Max)=1.2mm, Introduction Date=2006-04-01, Length=11mm, Lifecycle Status=Production, Manufacturer Part Number=IS61WV102416BLL-10MLI, Memory Format="RAM, SRAM - Asynchronous", Memory Size=2MB, Nominal Supply Current=95mA, Number of Circuits=1, Number of Ports=1, Number of Terminals=48, Pins=48, Pricing="1=30.23, 10=27.984, 25=27.0944, 50=26.427, 210=25.07214 (USD)", Radiation Hardening=No, REACH SVHC=Yes, RoHS=Compliant, Schedule B="8542320040, 8542320040|8542320040|8542320040|8542320040|8542320040", Stock=2937, Supplier=DigiKey, Sync/Async=Asynchronous, Terminal Pitch=750µm, Width=9mm, Word Size=16b
M3: "NOR Flash Parallel 3V/3.3V 128M-bit 16M x 8/8M x 16 75ns 64-Pin LBGA Tray", Manufacturer=Micron, Max Operating Temperature=85°C, Max Supply Current=50mA, Max Supply Voltage=3.6V, Min Operating Temperature=-40°C, Min Supply Voltage=2.7V, Nominal Supply Voltage (DC)=3V, Supplier Part Number=557-MT28EW128ABA1LPC-0SITTRCT-ND, Temperature Grade=Industrial, Access Time=70ns, Category=Flash, China RoHS=Compliant, ComponentLink1Description=https://datasheet.octopart.com:443/MT28EW128ABA1LPC-0SIT-TR-Micron-datasheet-149529402.pdf?src-supplier=IHS, ComponentLink1URL=https://datasheet.octopart.com:443/MT28EW128ABA1LPC-0SIT-TR-Micron-datasheet-149529402.pdf?src-supplier=IHS, Height - Seated (Max)=1.4mm, Length=13mm, Lifecycle Status=Production, Manufacturer Part Number="MT28EW128ABA1LPC-0SIT TR", Memory Format=FLASH, Number of Circuits=1, Number of Terminals=64, Pricing="1=49.57, 10=45.82, 25=44.3416, 50=43.2366, 100=42.1478 (USD)", REACH SVHC=Yes, RoHS=Compliant, Schedule B="8542320050|8542320050|8542320050|8542320050|8542320050, 8542320070", Stock=1600, Supplier=DigiKey, Terminal Pitch=1mm, Width=11mm
M4: "Tape & Reel (TR) Active 95 / 100 Stereo Audio codec 94dB 950mV 576mum 96ksps", Ambient Temperature Range High=85°C, Manufacturer="Cirrus Logic", Max Junction Temperature (Tj)=125°C, Max Supply Voltage=3.6V, Min Operating Temperature=-40°C, Min Supply Voltage=950mV, Nominal Supply Voltage (DC)=1V, Supplier Part Number=WM8994ECS/RDKR-ND, Temperature Grade=Industrial, Bandwidth=96kHz, Category=CODECs, ComponentLink1Description=https://datasheet.octopart.com:443/WM8994ECS-R-Cirrus-Logic-datasheet-180105754.pdf?src-supplier=IHS, ComponentLink1URL=https://datasheet.octopart.com:443/WM8994ECS-R-Cirrus-Logic-datasheet-180105754.pdf?src-supplier=IHS, ComponentLink2Description=https://datasheet.octopart.com:443/WM8994ECS-R-Cirrus-Logic-datasheet-12524610.pdf?src-supplier=Augswan, ComponentLink2URL=https://datasheet.octopart.com:443/WM8994ECS-R-Cirrus-Logic-datasheet-12524610.pdf?src-supplier=Augswan, ComponentLink3Description=https://datasheet.octopart.com:443/WM8994ECS-R-Cirrus-Logic-datasheet-134530321.pdf?src-supplier=HQonline, ComponentLink3URL=https://datasheet.octopart.com:443/WM8994ECS-R-Cirrus-Logic-datasheet-134530321.pdf?src-supplier=HQonline, Harmonized Tariff Schedule (HTS) Code=8542.39.00.01, Height=576µm, Height - Seated (Max)=785µm, Interface="2-Wire, I2C, I2S, SPI", Introduction Date=2010-03-11, Lead Free="Lead Free", Length=4.511mm, Lifecycle Status=Production, Manufacturer Part Number=WM8994ECS/R, Max Operating Temperature=85°C, Mounting Technology="Surface Mount", Number of A/D Converters=2, Number of Analog Inputs=8, Number of Analog Outputs=9, Number of Channels=4, Number of Circuits=1, Number of D/A Converters=4, Number of Terminals=72, Operating Supply Voltage=3.6V, Pins=72, Pricing="1=13.95, 10=10.997, 25=10.2576, 100=9.4455, 250=9.4248 (USD)", REACH SVHC=Yes, Resolution=3B, RoHS=Compliant, Sampling Rate=96ksps, Signal to Noise Ratio (SNR)=94dB, Stock=5308, Supplier=DigiKey, Terminal Pitch=500µm, Width=4.023mm
M5: "Conn Shrouded Header HDR 50 POS 2mm Solder ST Top Entry SMD Milli-Grid™ Tube", Color=Black, Contact Resistance=30mΩ, Current Rating=2A, Flammability Rating="UL94 V-0", Insulation Resistance=5GΩ, Manufacturer=Molex, Manufacturer Lifecycle Status=ACTIVE, Max Operating Temperature=105°C, Min Operating Temperature=-55°C, Operating Force=2.0016N, Supplier Part Number=23-0878325020-ND, Voltage Rating=125V, Category="Headers and Wire Housings", China RoHS=Compliant, ComponentLink1Description=https://datasheet.octopart.com:443/87832-5020-Molex-datasheet-136949551.pdf?src-supplier=Farnell, ComponentLink1URL=https://datasheet.octopart.com:443/87832-5020-Molex-datasheet-136949551.pdf?src-supplier=Farnell, ComponentLink2Description=https://datasheet.octopart.com:443/878325020-Molex-datasheet-5313840.pdf?src-supplier=Factory+Futures, ComponentLink2URL=https://datasheet.octopart.com:443/878325020-Molex-datasheet-5313840.pdf?src-supplier=Factory+Futures, ComponentLink3Description=https://sigma.octopart.com:443/10980148/technical_drawing/Molex-87832-5020.pdf?src-supplier=Molex, ComponentLink3URL=https://sigma.octopart.com:443/10980148/technical_drawing/Molex-87832-5020.pdf?src-supplier=Molex, ComponentLink4Description=https://datasheet.octopart.com:443/87832-5020-Molex-datasheet-16471356.pdf?src-supplier=Molex, ComponentLink4URL=https://datasheet.octopart.com:443/87832-5020-Molex-datasheet-16471356.pdf?src-supplier=Molex, ComponentLink5Description=https://datasheet.octopart.com:443/87832-5020-Molex-datasheet-193135970.pdf?src-supplier=JRH+Electronics, ComponentLink5URL=https://datasheet.octopart.com:443/87832-5020-Molex-datasheet-193135970.pdf?src-supplier=JRH+Electronics, ComponentLink6Description=https://datasheet.octopart.com:443/87832-5020-Molex-datasheet-154760575.pdf?src-supplier=Master+Electronics, ComponentLink6URL=https://datasheet.octopart.com:443/87832-5020-Molex-datasheet-154760575.pdf?src-supplier=Master+Electronics, ComponentLink7Description=https://datasheet.octopart.com:443/87832-5020-Molex-datasheet-120074161.pdf?src-supplier=Newark, ComponentLink7URL=https://datasheet.octopart.com:443/87832-5020-Molex-datasheet-120074161.pdf?src-supplier=Newark, ComponentLink8Description=https://datasheet.octopart.com:443/87832-5020-Molex-datasheet-62067460.pdf?src-supplier=element14+APAC, ComponentLink8URL=https://datasheet.octopart.com:443/87832-5020-Molex-datasheet-62067460.pdf?src-supplier=element14+APAC, ComponentLink9Description=https://datasheet.octopart.com:443/87832-5020-Molex-datasheet-58786524.pdf?src-supplier=element14+APAC, ComponentLink9URL=https://datasheet.octopart.com:443/87832-5020-Molex-datasheet-58786524.pdf?src-supplier=element14+APAC, ComponentLink10Description=https://datasheet.octopart.com:443/87832-5020-Molex-datasheet-48881773.pdf?src-supplier=element14+APAC, ComponentLink10URL=https://datasheet.octopart.com:443/87832-5020-Molex-datasheet-48881773.pdf?src-supplier=element14+APAC, ComponentLink11Description=https://datasheet.octopart.com:443/87832-5020-Molex-datasheet-62281904.pdf?src-supplier=Electro+Sonic, ComponentLink11URL=https://datasheet.octopart.com:443/87832-5020-Molex-datasheet-62281904.pdf?src-supplier=Electro+Sonic, ComponentLink12Description=https://datasheet.octopart.com:443/87832-5020-Molex-datasheet-37172766.pdf?src-supplier=Electro+Sonic, ComponentLink12URL=https://datasheet.octopart.com:443/87832-5020-Molex-datasheet-37172766.pdf?src-supplier=Electro+Sonic, ComponentLink13Description=https://datasheet.octopart.com:443/87832-5020-Molex-datasheet-23711305.pdf?src-supplier=Electro+Sonic, ComponentLink13URL=https://datasheet.octopart.com:443/87832-5020-Molex-datasheet-23711305.pdf?src-supplier=Electro+Sonic, ComponentLink14Description=https://datasheet.octopart.com:443/878325020-Molex-datasheet-7554152.pdf?src-supplier=Jameco+(USA), ComponentLink14URL=https://datasheet.octopart.com:443/878325020-Molex-datasheet-7554152.pdf?src-supplier=Jameco+(USA), ComponentLink15Description=https://datasheet.octopart.com:443/87832-5020-Molex-datasheet-8215764.pdf?src-supplier=Jameco+(USA), ComponentLink15URL=https://datasheet.octopart.com:443/87832-5020-Molex-datasheet-8215764.pdf?src-supplier=Jameco+(USA), ComponentLink16Description=https://datasheet.octopart.com:443/87832-5020-Molex-datasheet-166191.pdf?src-supplier=Mouser, ComponentLink16URL=https://datasheet.octopart.com:443/87832-5020-Molex-datasheet-166191.pdf?src-supplier=Mouser, ComponentLink17Description=https://datasheet.octopart.com:443/87832-5020-Molex-datasheet-120596.pdf?src-supplier=DigiKey, ComponentLink17URL=https://datasheet.octopart.com:443/87832-5020-Molex-datasheet-120596.pdf?src-supplier=DigiKey, ComponentLink18Description=http://sigma.octopart.com:80/16471357/rohs_statement/Molex-87832-5020.pdf?src-supplier=Compliance+Statements, ComponentLink18URL=http://sigma.octopart.com:80/16471357/rohs_statement/Molex-87832-5020.pdf?src-supplier=Compliance+Statements, ComponentLink19Description=http://sigma.octopart.com:80/reach_statement/Molex-company-74.pdf?src-supplier=Compliance+Statements, ComponentLink19URL=http://sigma.octopart.com:80/reach_statement/Molex-company-74.pdf?src-supplier=Compliance+Statements, ComponentLink20Description=http://sigma.octopart.com:80/rohs_statement/Molex-company-73.pdf?src-supplier=Compliance+Statements, ComponentLink20URL=http://sigma.octopart.com:80/rohs_statement/Molex-company-73.pdf?src-supplier=Compliance+Statements, ComponentLink21Description=http://sigma.octopart.com:80/conflict_mineral_statement/Molex-company-72.pdf?src-supplier=Compliance+Statements, ComponentLink21URL=http://sigma.octopart.com:80/conflict_mineral_statement/Molex-company-72.pdf?src-supplier=Compliance+Statements, Connector Type="Male Pin", Contact Material=Brass, Contact Mating Length=3.5814mm, Contact Plating=Gold, Country of Origin=SG, Export Control Classification Number (ECCN) Code=EAR99, Gender=Male, Glow Wire Compliant=Non-compliant, Harmonized Tariff Schedule (HTS) Code=8536.69.40.40, Housing Color=Black, Housing Material=Thermoplastic, Insulation Color=Black, Introduction Date=2005-08-24, Lead Free="Contains Lead", Lead Pitch=2mm, Lifecycle Status=Production, Manufacturer Part Number=87832-5020, Mounting Technology="Surface Mount", Number of Circuits=50, Number of Contacts=50, Number of Positions=50, Number of Rows=2, Orientation=Vertical, Pins=50, Pitch=2.0066mm, Plating=Tin, Plating Thickness=381nm, Pricing="1=6.88, 10=5.847, 100=4.9695, 500=4.43622, 1000=4.22468 (USD)", Radiation Hardening=No, REACH SVHC=Yes, RoHS=Compliant, Row Spacing=4.2418mm, Shrouded="Yes RoHS Compliant: Yes", Stock=1664, Supplier=DigiKey, Terminal Pitch=2mm, Termination=Solder, Voltage Rating (DC)=125V
M6: "LAN8742A Series 3.3 V Small Footprint RMII 10/100 Ethernet Transceiver - VQFN-24", Ambient Temperature Range High=70°C, Case/Package=QFN, Manufacturer=Microchip, Manufacturer Lifecycle Status=REL, Max Supply Voltage=3.6V, Min Operating Temperature=0°C, Min Supply Voltage=1.14V, Supplier Part Number=LAN8742A-CZ-DKR-ND, Category="Ethernet Interface ICs", ComponentLink1Description=https://datasheet.octopart.com:443/LAN8742A-CZ-TR-Microchip-datasheet-79167677.pdf?src-supplier=Microchip, ComponentLink1URL=https://datasheet.octopart.com:443/LAN8742A-CZ-TR-Microchip-datasheet-79167677.pdf?src-supplier=Microchip, ComponentLink2Description=https://datasheet.octopart.com:443/LAN8742A-CZ-TR-Microchip-datasheet-21087199.pdf?src-supplier=SHENGYU+ELECTRONICS, ComponentLink2URL=https://datasheet.octopart.com:443/LAN8742A-CZ-TR-Microchip-datasheet-21087199.pdf?src-supplier=SHENGYU+ELECTRONICS, ComponentLink3Description=http://sigma.octopart.com:80/188454385/materials_sheet/Microchip-LAN8742A-CZ-TR.pdf?src-supplier=Compliance+Statements, ComponentLink3URL=http://sigma.octopart.com:80/188454385/materials_sheet/Microchip-LAN8742A-CZ-TR.pdf?src-supplier=Compliance+Statements, ComponentLink4Description=http://sigma.octopart.com:80/192423903/materials_sheet/Microchip-LAN8742A-CZ-TR.pdf?src-supplier=Compliance+Statements, ComponentLink4URL=http://sigma.octopart.com:80/192423903/materials_sheet/Microchip-LAN8742A-CZ-TR.pdf?src-supplier=Compliance+Statements, ComponentLink5Description=http://sigma.octopart.com:80/rohs_statement/Microchip-company-71.pdf?src-supplier=Compliance+Statements, ComponentLink5URL=http://sigma.octopart.com:80/rohs_statement/Microchip-company-71.pdf?src-supplier=Compliance+Statements, ComponentLink6Description=http://sigma.octopart.com:80/reach_statement/Microchip-company-70.pdf?src-supplier=Compliance+Statements, ComponentLink6URL=http://sigma.octopart.com:80/reach_statement/Microchip-company-70.pdf?src-supplier=Compliance+Statements, ComponentLink7Description=http://sigma.octopart.com:80/conflict_mineral_statement/Microchip-company-69.pdf?src-supplier=Compliance+Statements, ComponentLink7URL=http://sigma.octopart.com:80/conflict_mineral_statement/Microchip-company-69.pdf?src-supplier=Compliance+Statements, ComponentLink8Description=http://sigma.octopart.com:80/conflict_mineral_statement/Microchip-company-68.pdf?src-supplier=Compliance+Statements, ComponentLink8URL=http://sigma.octopart.com:80/conflict_mineral_statement/Microchip-company-68.pdf?src-supplier=Compliance+Statements, Country of Assembly=Taiwan, Country of Fabrication=Singapore, Country of Origin=Taiwan, Data Rate=100Mbps, Export Control Classification Number (ECCN) Code=EAR99, Harmonized Tariff Schedule (HTS) Code=8542.39.0060, Height=1mm, HS Code=8542.39.0090, Interface=Ethernet, Lifecycle Status=Production, Manufacturer Part Number=LAN8742A-CZ-TR, Max Operating Temperature=70°C, Mounting Technology="Surface Mount", Number of Channels=1, Number of Transceivers=1, Pins=24, Pricing="1=1.53, 25=1.3312 (USD)", Projected EOL Date=2039-04-22, Radiation Hardening=No, RoHS=Compliant, Schedule B="8542390000, 8542390000|8542390000|8542390000|8542390000|8542390000", Stock=18382, Supplier=DigiKey
M7: "Modular Connectors / Ethernet; PULSE; J0011D21BNL; Through Hole; 1; Gold; Right Angle", Current Rating=8mA, Dielectric Material=Polyethylene, Manufacturer="Yageo Group", Max Operating Temperature=70°C, Min Operating Temperature=0°C, Supplier Part Number=553-1485-ND, Category="Modular / Ethernet Connectors", ComponentLink1Description=https://datasheet.octopart.com:443/J0011D21BNL-Pulse-datasheet-136285170.pdf?src-supplier=IHS, ComponentLink1URL=https://datasheet.octopart.com:443/J0011D21BNL-Pulse-datasheet-136285170.pdf?src-supplier=IHS, ComponentLink2Description=https://datasheet.octopart.com:443/J0011D21BNL-Pulse-datasheet-13694865.pdf?src-supplier=Sager+Electronics, ComponentLink2URL=https://datasheet.octopart.com:443/J0011D21BNL-Pulse-datasheet-13694865.pdf?src-supplier=Sager+Electronics, ComponentLink3Description=https://datasheet.octopart.com:443/J0011D21BNL-Pulse-datasheet-120436.pdf?src-supplier=Factory+Futures, ComponentLink3URL=https://datasheet.octopart.com:443/J0011D21BNL-Pulse-datasheet-120436.pdf?src-supplier=Factory+Futures, ComponentLink4Description=https://datasheet.octopart.com:443/J0011D21BNL-Pulse-datasheet-8370086.pdf?src-supplier=Factory+Futures, ComponentLink4URL=https://datasheet.octopart.com:443/J0011D21BNL-Pulse-datasheet-8370086.pdf?src-supplier=Factory+Futures, ComponentLink5Description=https://datasheet.octopart.com:443/J0011D21BNL-Pulse-Electronics-datasheet-184773489.pdf?src-supplier=JRH+Electronics, ComponentLink5URL=https://datasheet.octopart.com:443/J0011D21BNL-Pulse-Electronics-datasheet-184773489.pdf?src-supplier=JRH+Electronics, ComponentLink6Description=https://datasheet.octopart.com:443/J0011D21BNL-Pulse-datasheet-11630033.pdf?src-supplier=Arrow+Electronics, ComponentLink6URL=https://datasheet.octopart.com:443/J0011D21BNL-Pulse-datasheet-11630033.pdf?src-supplier=Arrow+Electronics, ComponentLink7Description=https://datasheet.octopart.com:443/J0011D21BNL-Pulse-datasheet-8618382.pdf?src-supplier=Component+Distributors+Inc., ComponentLink7URL=https://datasheet.octopart.com:443/J0011D21BNL-Pulse-datasheet-8618382.pdf?src-supplier=Component+Distributors+Inc., ComponentLink8Description=http://sigma.octopart.com:80/conflict_mineral_statement/Yageo-company-3.pdf?src-supplier=Compliance+Statements, ComponentLink8URL=http://sigma.octopart.com:80/conflict_mineral_statement/Yageo-company-3.pdf?src-supplier=Compliance+Statements, ComponentLink9Description=http://sigma.octopart.com:80/rohs_statement/Yageo-company-2.pdf?src-supplier=Compliance+Statements, ComponentLink9URL=http://sigma.octopart.com:80/rohs_statement/Yageo-company-2.pdf?src-supplier=Compliance+Statements, Connector Type=RJ45, Contact Material="Gold, Nickel", Contact Plating=Gold, Depth=21.59mm, Direction=Down, Gender=Female, Height=16.64mm, Housing Material=Thermoplastic, Lead Free="Lead Free", Length=16.26mm, Lifecycle Status=Production, Manufacturer Part Number=J0011D21BNL, Mounting Technology="Through Hole", Number of Contacts=8, Number of Cores per Jack=4, Number of Ports=1, Number of Positions=8, Number of Positions Loaded=8, Number of Rows=4, Orientation="Right Angle", Pins=8, Pitch=2.54mm, Pricing="1=9.55, 10=8.119, 25=7.6104, 50=7.247, 100=6.9011, 250=6.46924, 500=6.16068, 1000=5.867 (USD)", REACH SVHC=Yes, RoHS=Compliant, Shell Finish=Nickel, Shell Material=Brass, Shielding=Shielded, Stock=875, Supplier=DigiKey, Terminal Pitch=2.54mm, Termination=Solder